# Altium PCB Grant..PcbDoc (part 4 of 5)
Units mil, origin at the board's own origin, x right, y up, seen from the top; angles counter-clockwise.
Board outline 2981 x 2481 mil, 2 copper layers (Top Layer, Bottom Layer), stack 57 mil thick; 181 components, 108 nets, 631 pads, 224 vias.
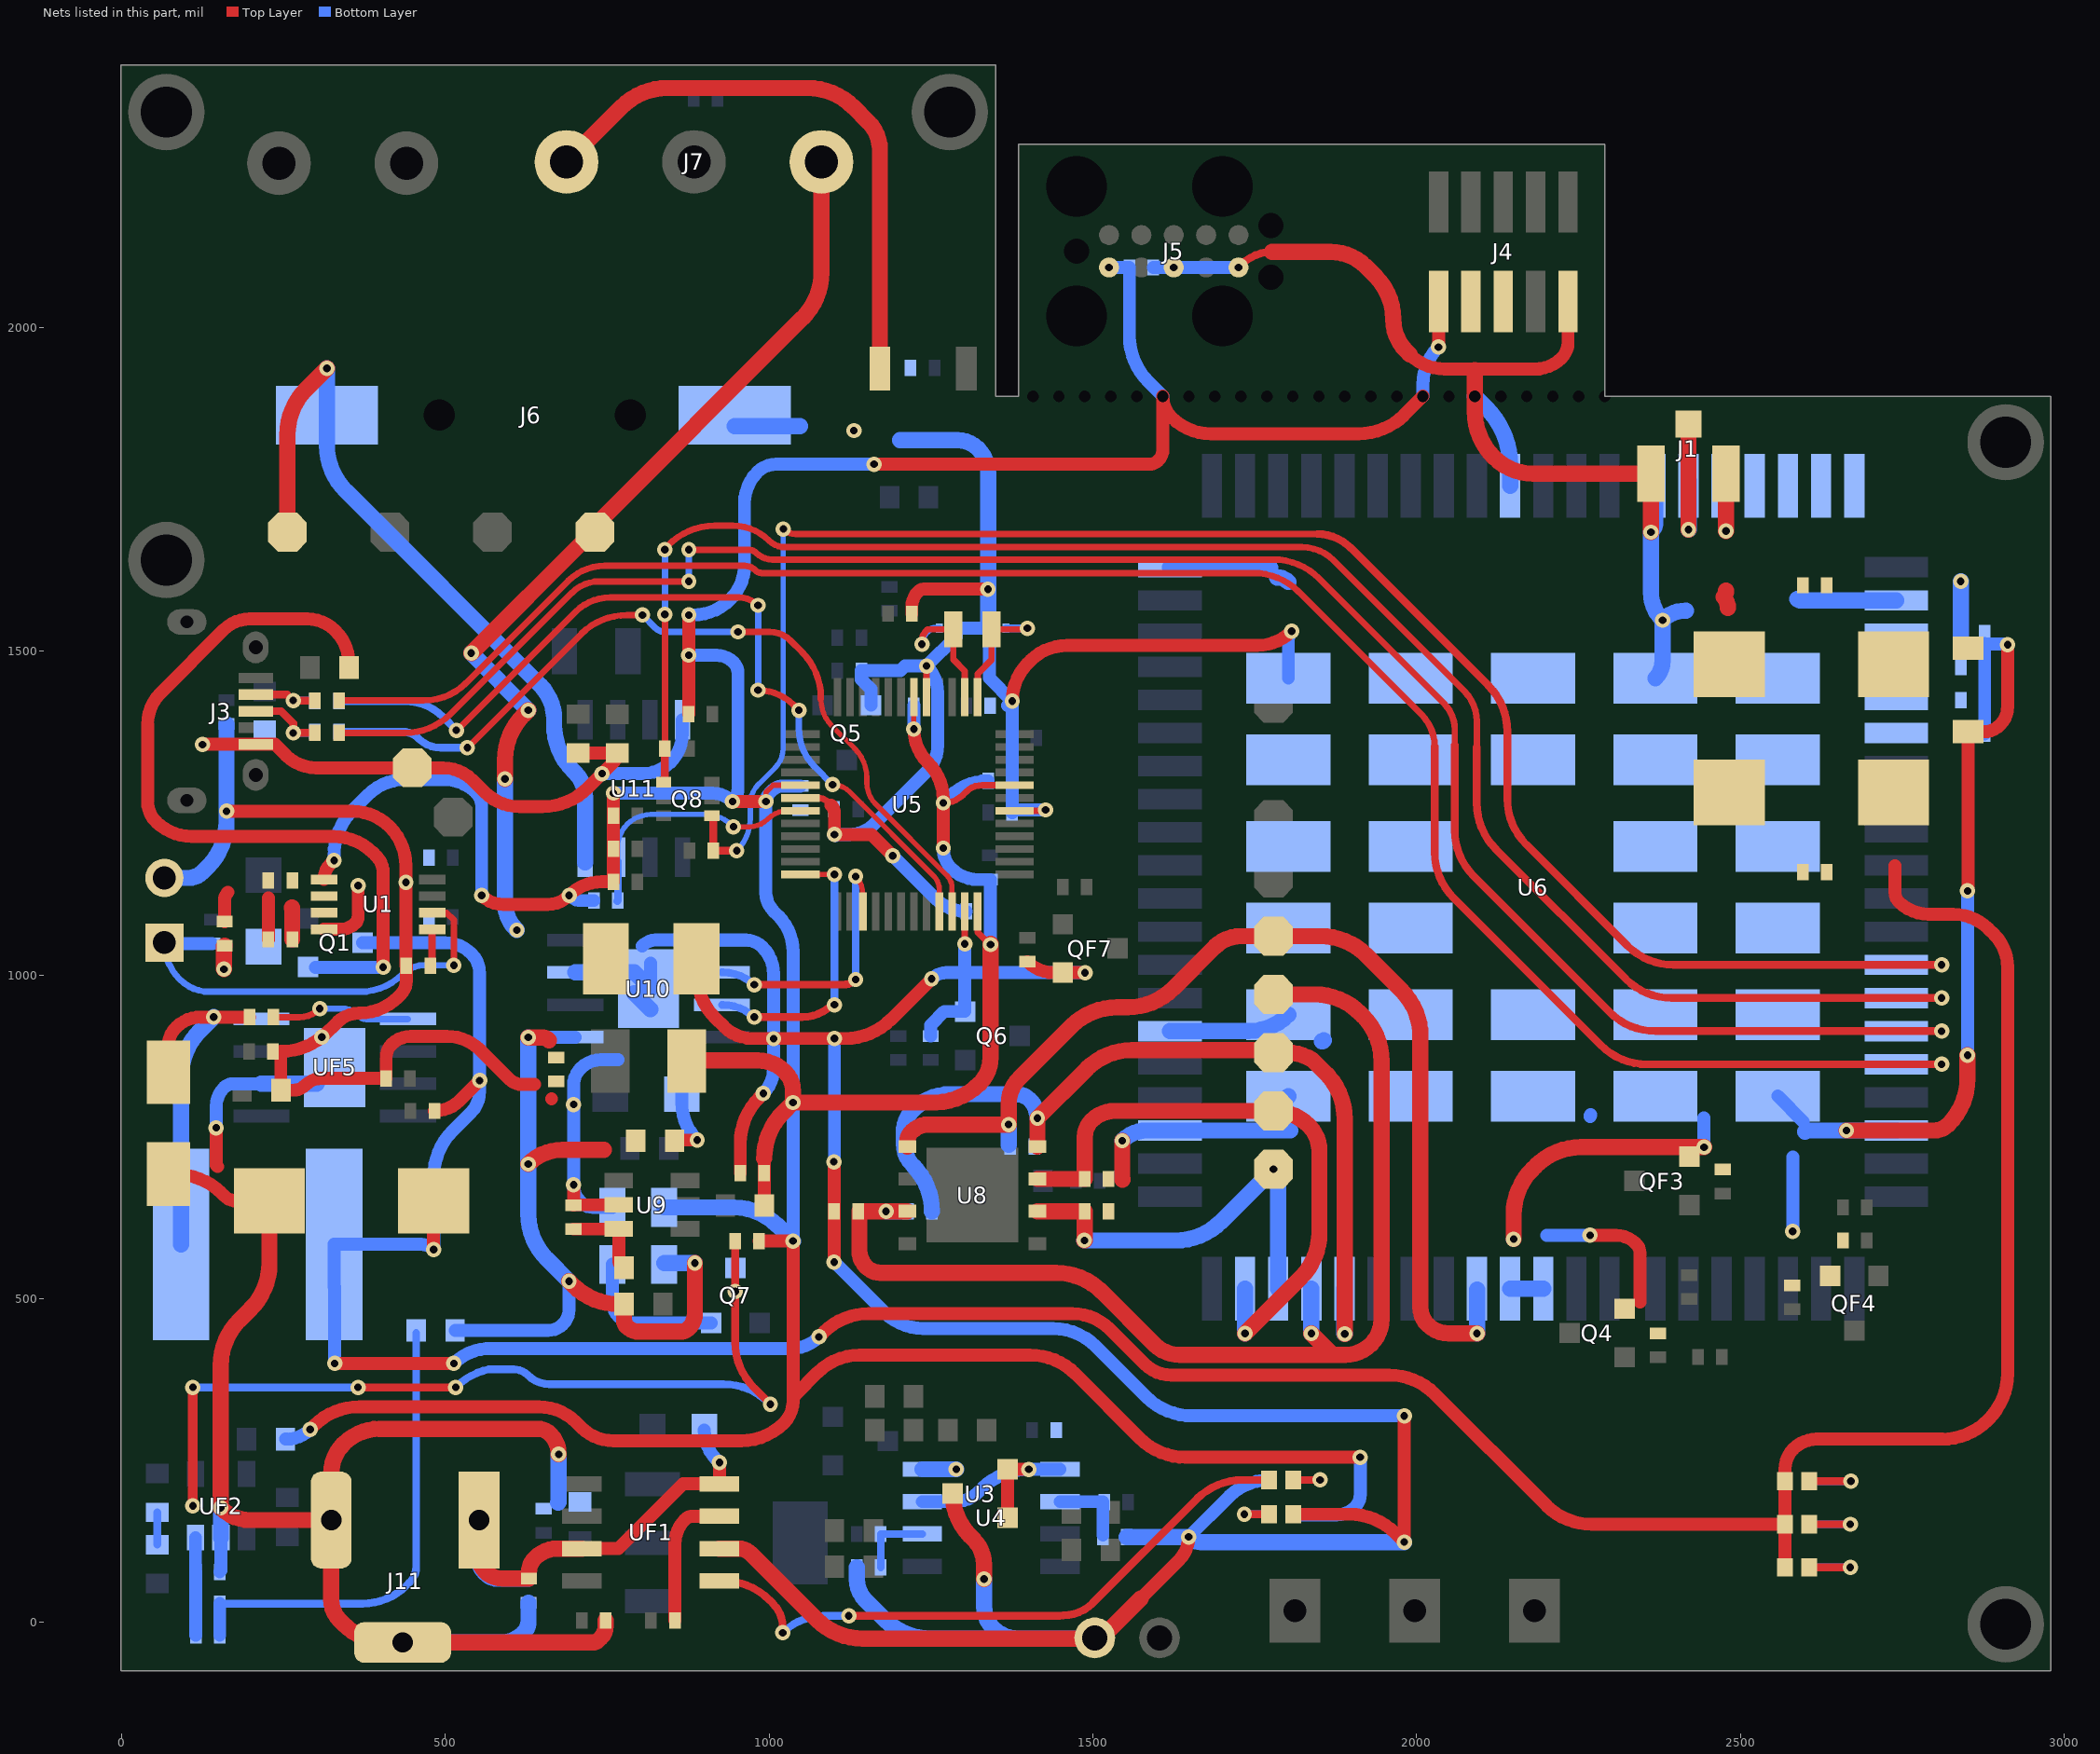
[diagram p2: the nets of this part, all layers, seen from the top]

## Via types
v1: diameter 23.62, hole 11.81, Top Layer to Bottom Layer, 224 vias

## Nets (pads, with @x,y where several pads share a name; then routed paths per layer and width w, separated by ;. In a path a pad name is that pad's centre, name@x,y a point inside that pad or via, vN(x,y) a via of type N, cw(c..) or ccw(c..) an arc to the next point about the centre after c; other vN are vias at no path point) (continued)
MCU_D+: (continued)
  Top Layer w10: v1(534,1351) 709.71,1526.71 cw(c780.42,1456) 780.42,1556 v1(804.5,1556) ; v1(952,1530) 1000.96,1530 cw(c1000.96,1484.69) 1033,1516.73 1050.71,1499.02 cw(c980,1428.31) 1080,1428.31 1080,1425.34
  Bottom Layer w10: v1(804.5,1556) 824.49,1536.01 ccw(c839,1550.52) 839,1530 v1(952,1530)
  Bottom Layer w12: RF23.1@335.5,1376 432.44,1376 cw(c432.44,1338.44) 459,1365 ccw(c492.8,1398.8) 492.8,1351 v1(534,1351) ; v1@532.5,1352.5 v1@533,1353
MCU_D-: RF22.1 U5.33 | length 1353.7
  Top Layer w8: v1(1098,1294) cw(c1098,1257.16) 1124.05,1283.21 1254.24,1153.02 cw(c1233.21,1132) 1262.94,1132 U5.33@1262.94,1098.29
  Top Layer w10: v1@517.5,1377.5 701,1561 cw(c754.11,1507.89) 754.11,1583 954.03,1583 cw(c954.03,1542.03) v1(983,1571) ; v1(983,1440) cw(c983,1362.75) 1037.63,1417.37 v1(1046,1409)
  Bottom Layer w10: v1(983,1440) v1(983,1571) ; v1(1046,1409) 1046,1381 ccw(c1130.5,1381) 1070.72,1321.28 ; 1070.75,1321.25 v1(1098,1294)
  Bottom Layer w12: RF22.1@335.5,1423 437.58,1423 cw(c437.58,1339.9) 496.34,1398.66 v1(517,1378)
MFP: R25.1 U5.19 U11.7 | length 400.7
  Top Layer w8: v1(945,1229) 969.03,1229 ccw(c969.03,1269.97) 998,1241 cw(c1028.91,1210.09) 1028.91,1253.8 U5.19@1048.38,1253.8
  Bottom Layer w8: U11.7@766,1181.7 766,1196.68 cw(c817.21,1196.68) 781,1232.89 cw(c817.47,1196.42) 817.47,1248 901.13,1248 cw(c901.13,1187.96) 943.59,1230.41 v1(945,1229)
  Bottom Layer w12: R25.1@765.5,1114 ccw(c764.29,1115.21) R25.1@766,1115.21 ; U11.7@766,1175.7 cw(c764.79,1174.49) 766.5,1174.49 R25.1@766.5,1115
NetC5_2: C5.2 U1.5 | length 56.6
  Top Layer w12: U1.5@479.46,1070.61 479.46,1014.04 C5.2@479.5,1014
NetCF7_1: CF7.1 UF5.1 | length 215.4
  Top Layer w10: CF7.1@234.5,935 274.62,935 ccw(c274.62,979.38) v1(306,948)
  Bottom Layer w10: v1(306,948) 339.03,948 cw(c339.03,907.03) 368,936 ccw(c377.66,945.66) 377.66,932 UF5.1@442.19,932
NetCF17_2: CF17.2 RF31.1 SB12.1 | length 739.7
  Bottom Layer w12: CF17.2@151.5,29 372,29 ccw(c372,125.57) 440.28,57.28 445,62 ccw(c420.86,86.14) 455,86.14 SB12.1@455,447
  Bottom Layer w20: RF31.1@151.5,-20 CF17.2@151.5,29
NetD1_A: D1.A Q1.1 R2.2 SB1.2 | length 1261.4
  Top Layer w20: 329.97,1532.03 ccw(c286.54,1488.54) 286.54,1550 198,1550 ccw(c198,1493.01) 157.7,1533.31 60.23,1435.83 ccw(c109.06,1387) 40,1387 40,1268.38 ccw(c84.38,1268.38) 53,1237 ccw(c108.53,1292.53) 108.53,1214 327,1214 cw(c327,1127.09) 388.46,1188.54 393,1184 cw(c366.44,1157.44) 404,1157.44 v1(404,1012) ; 330,1532 cw(c279.3,1481.3) 351,1481.3 SB1.2@351,1475
  Top Layer w25: v1(158,1009) 158,1044.5 R2.2@159,1045.5
  Bottom Layer w20: Q1.1@299,1012 v1(404,1012)
NetD3_K: D3.K SB11.1 | length 114.7
  Top Layer w20: SB11.1@854,744 cw(c856.41,741.59) 856.41,745 v1(889,745)
  Bottom Layer w20: D3.K@865.12,818 865.12,802.66 ccw(c946.66,802.66) v1(889,745)
NetLED1_1: LED1.1 R1.1 | length 76.1
  Top Layer w12: v1(1734,167) LED1.1@1772.3,167
  Bottom Layer w12: v1(1734,167) 1769.09,167 cw(c1769.09,163.59) R1.1@1771.5,166
NetLED2_2: LED2.2 R5.1 | length 83.1
  Top Layer w12: LED2.2@1809.4,220 v1(1851,220)
  Bottom Layer w12: R5.1@1809.5,220 v1(1851,220)
NetLED3_2: LED3.2 R10.2 | length 127.8
  Top Layer w12: LED3.2@2606.7,85 v1(2670,85)
  Bottom Layer w12: R10.2@2605.5,85 v1(2670,85)
NetLED4_2: LED4.2 R11.2 | length 131.8
  Top Layer w12: LED4.2@2606.7,151.5 v1(2670,151.5)
  Bottom Layer w12: R11.2@2605.5,150 cw(c2609.12,146.38) R11.2@2609.12,151.5 ; R11.2@2605.5,151.5 R11.2@2609.12,151.5 ; v1(2670,151.5) R11.2@2609.12,151.5
NetLEDF1_2: LEDF1.2 R31.2 | length 129.8
  Top Layer w12: LEDF1.2@2606.7,218 v1(2671,218)
  Bottom Layer w12: R31.2@2605.5,218 v1(2671,218)